# Altium PCB SYNCBOX.PcbDoc (part 3 of 6)
Units mil, origin at the board's own origin, x right, y up, seen from the top; angles counter-clockwise.
Board outline 8392.2 x 6163.59 mil, 6 copper layers (L1, L2, L3, L4 (PWR), L5, L6), stack 60.709 mil thick; 316 components, 422 nets, 1421 pads, 499 vias.
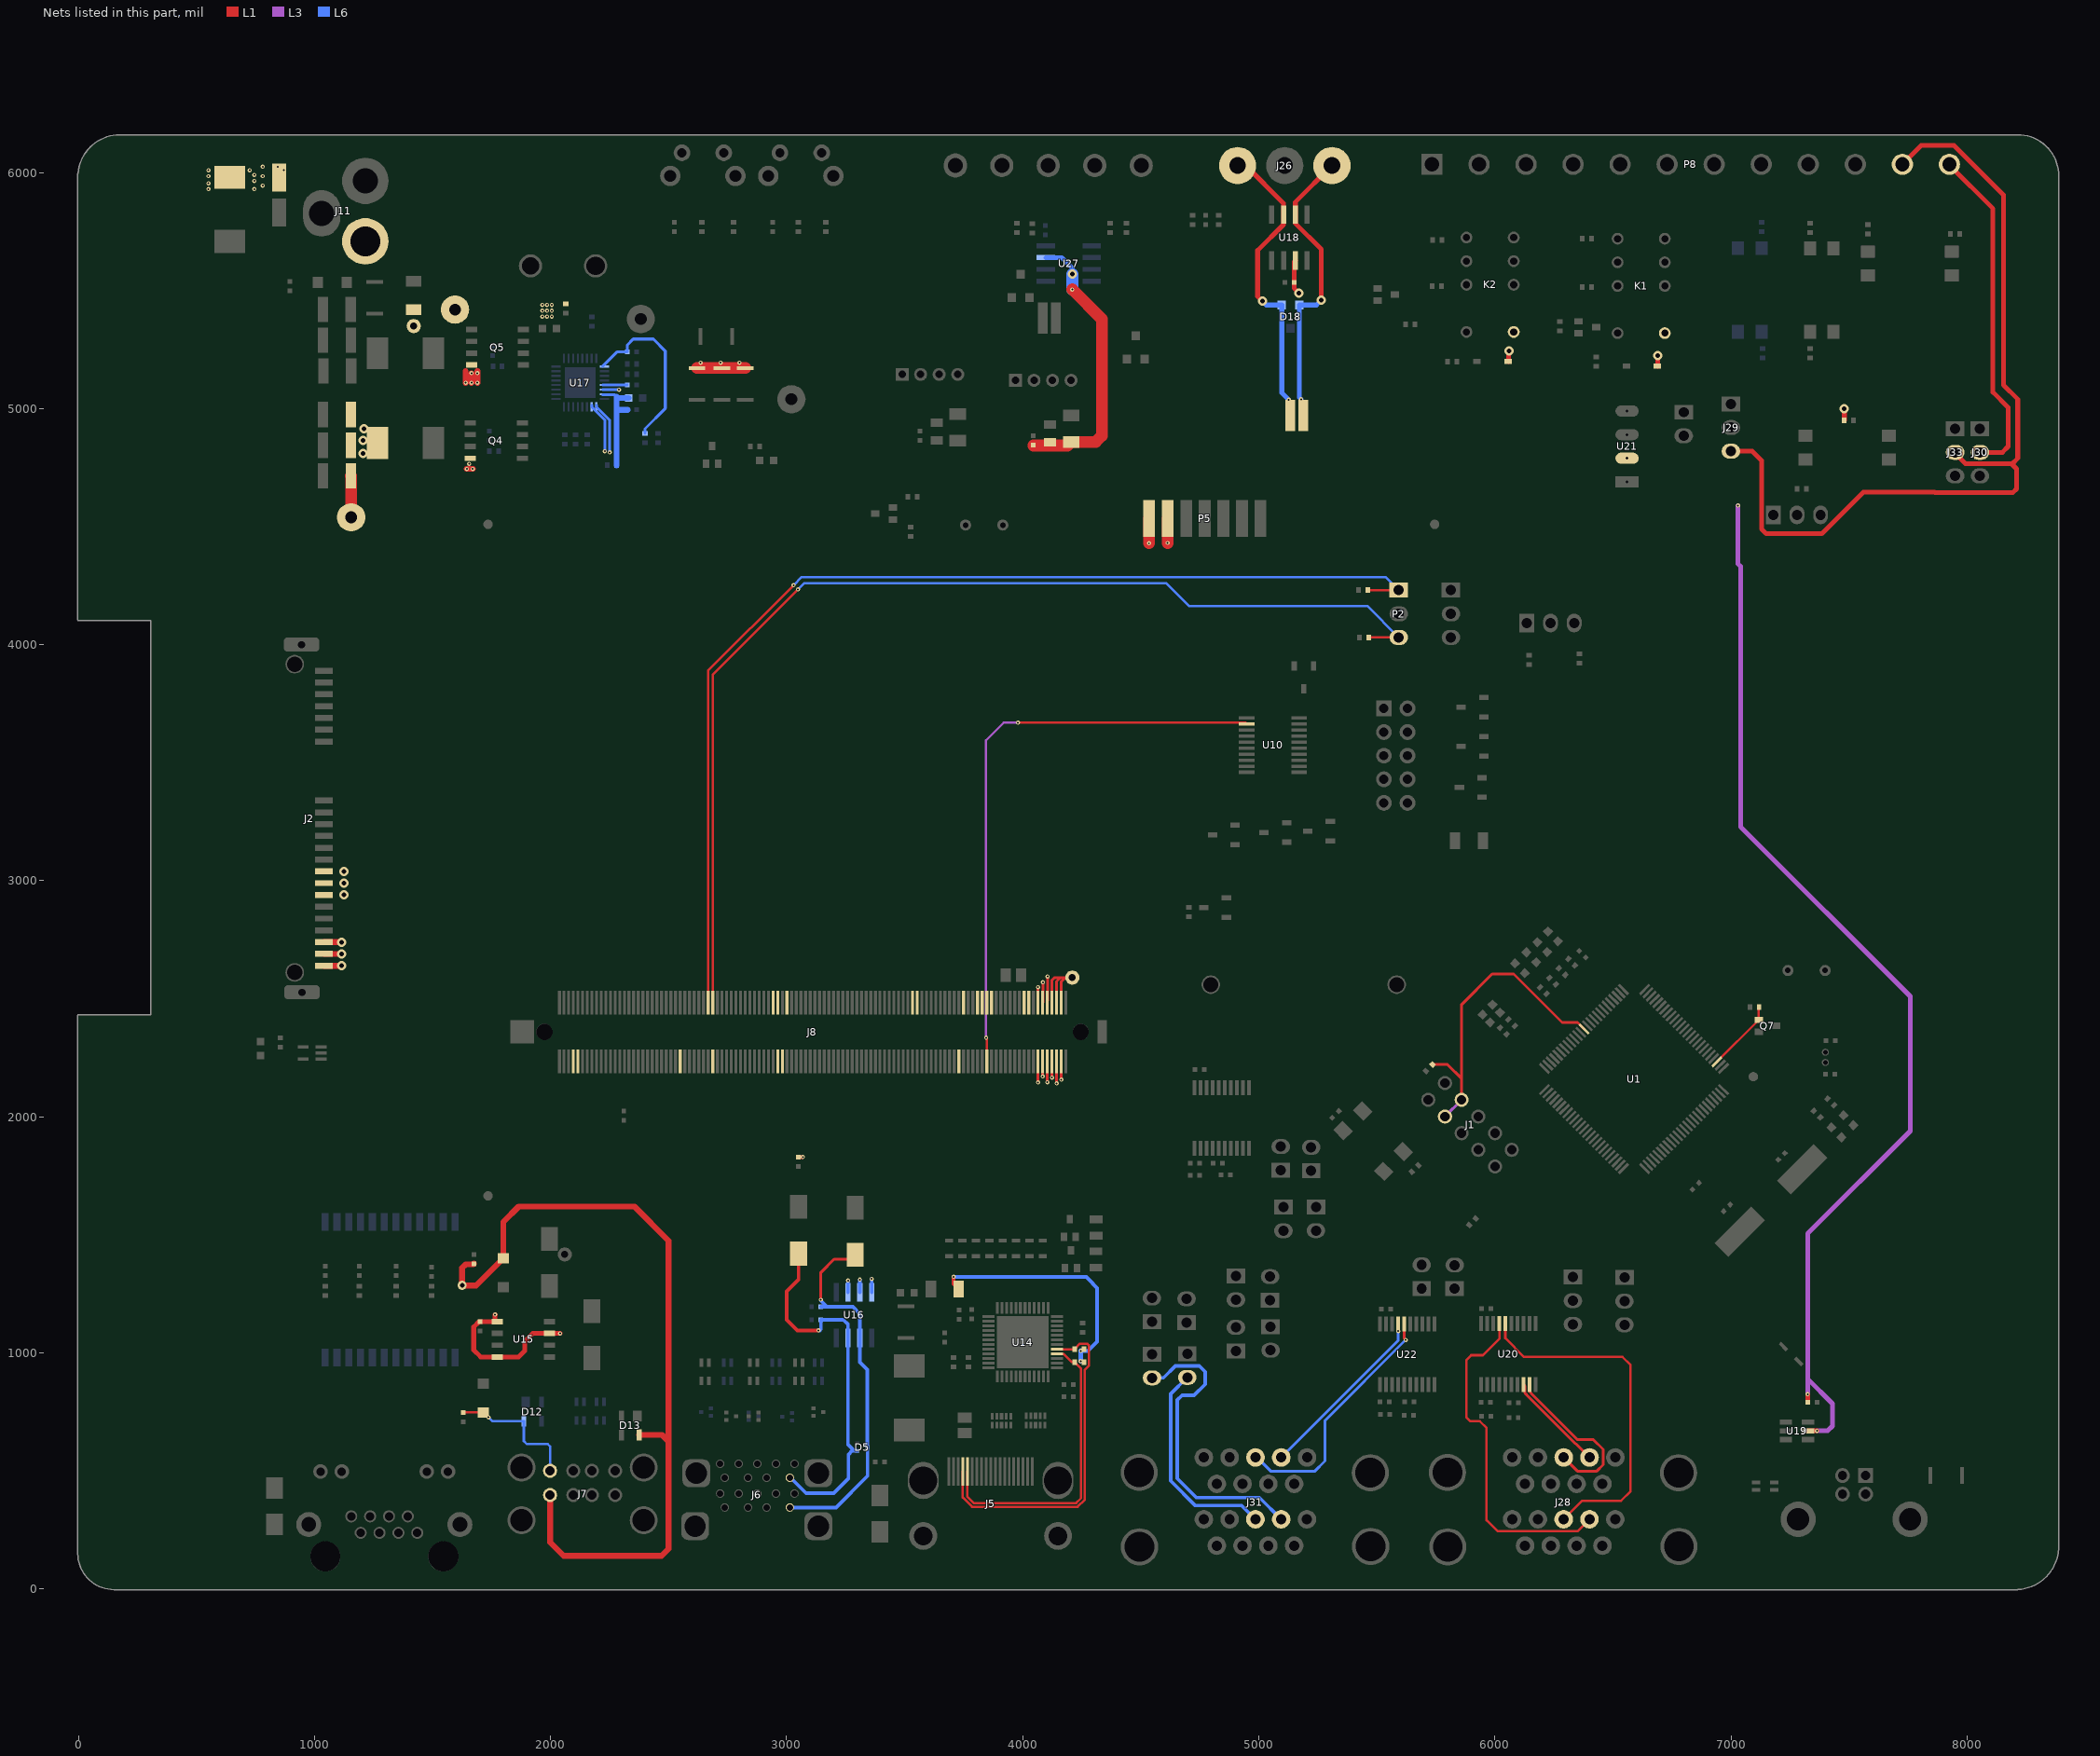
[diagram p6: the nets of this part, all layers, seen from the top]

## Part data (continued)
J9 J10: library part 0532530470, "CONN HEADER 4POS 2MM VERT TIN", Color=-, Manufacturer="Molex Inc", Supplier Part Number 1=WM19006-ND, .Creator=MM, Category="Connectors, Interconnects", ComponentLink1Description=http://www.molex.com/pdm_docs/sd/532530270_sd.pdf, ComponentLink1URL=http://www.molex.com/pdm_docs/sd/532530270_sd.pdf, Connector Type="Header, Shrouded", Contact Finish=Tin, Contact Finish Thickness=-, Contact Mating Length="0.130\" (3.30mm)", Contact Type="Male Pin", Fastening Type=-, Features=-, Manufacturer Part Number=0532530470, Mounting Type="Through Hole", Number of Positions=4, Number of Positions Loaded=All, Number of Rows=1, Packaging=Tray, Pitch="0.079\" (2.00mm)", Pricing 1="1=0.23, 10=0.211, 50=0.1576, 100=0.1464, 250=0.12948, 500=0.12386, 1000=0.10134, 2500=0.0929, 5000=0.09008 (USD)", RoHS="RoHS Compliant", Row Spacing=-, Stock 1=5160, Supplier 1=Digi-Key, Termination=Press-Fit
J11: "CONN PWR JACK 2.1X5.5MM HIGH CUR", Color=Black, Current Rating=5A, Manufacturer="CUI Inc", Operating Temperature="-25°C ~ 85°C", Supplier Part Number=CP-002AH-ND, Voltage - Rated=24VDC, Category="Connectors, Interconnects", ComponentLink1Description=http://products.cui.com/GetSpecForDigiKey.aspx?MFGNum=PJ-002AH, ComponentLink1URL=http://products.cui.com/GetSpecForDigiKey.aspx?MFGNum=PJ-002AH, Connector Type=Jack, Contact Material="Copper Alloy", Contact Material - Plating=Nickel, Family="Barrel - Power", Features=-, Gender=Male, Housing Color=Black, Housing Material=Thermoplastic, Internal Switch(s)="Single Switch, Normally Closed", Manufacturer Part Number=PJ-002AH, Mating connector="2.1mm ID, 5.5mm OD", Mounting Type="Through Hole, Right Angle", Number of Positions/Contacts="2 Conductors, 3 Contacts", Plug/Mating Plug Diameter="2.1mm ID, 5.5mm OD", Price 1k [$]=0.23625, Pricing 1="1=1.01, 10=0.704, 100=0.4724, 500=0.3819, 1000=0.3417, 2500=0.27135 (USD)", RoHS="RoHS Compliant", Shielding=Unshielded, Stock 1=138933, Supplier=Digikey, Supplier 1=Digi-Key, Supplier Part Number 1=CP-002AH-ND, Termination="Solder Eyelet(s)"
J12 J13 J14 J15 J16 J17 J18 J19 J20 J21 J22 J23 J24 J25 J32: library part 68001-202HLF, "BERGSTIK II .100\" SR STRAIGHT", Color=Black, Manufacturer=FCI, Supplier Part Number 1=609-3469-ND, Category="Connectors, Interconnects", ComponentLink1Description=http://portal.fciconnect.com/res/en/pdffiles/doc_search/68000.pdf, ComponentLink1URL=http://portal.fciconnect.com/res/en/pdffiles/doc_search/68000.pdf, Connector Type="Header, Unshrouded", Contact Finish=Gold, Contact Finish Thickness="15µin (0.38µm)", Contact Mating Length="0.230\" (5.84mm)", Contact Type="Male Pin", Fastening Type=-, Features=-, Manufacturer Part Number=68001-202HLF, Mounting Type="Through Hole", Number of Positions=2, Number of Positions Loaded=All, Number of Rows=1, Packaging=Bulk, Pitch="0.100\" (2.54mm)", Pricing 1="1=0.45, 10=0.265, 100=0.1172, 250=0.09828, 500=0.09072, 1000=0.07938, 5000=0.05065 (USD)", RoHS="RoHS Compliant", Row Spacing=-, Stock 1=13680, Supplier 1=Digi-Key, Termination=Solder
  J12 J13 J14 J15 J16 J17 J19 J20 J22 J23 J24 J25 J32: .Checked SCH=CHK
J26: library part 796644-3, "TERM BLOCK HDR 3POS 90DEG 5MM", Color=Green, Current - IEC=-, Manufacturer 1="TE Connectivity AMP Connectors", Material Flammability Rating="UL94 V-0", Operating Temperature="-40°C ~ 110°C", Supplier Part Number 1=A98249-ND, Built_By=EMA_UL_Team, C="Copyright (C) 2015 Accelerated Designs. All rights reserved", Category="Connectors, Interconnects", ComponentLink1Description=http://www.te.com/commerce/DocumentDelivery/DDEController?Action=srchrtrv&DocNm=796644&DocType=Customer+Drawing&DocLang=English, ComponentLink1URL=http://www.te.com/commerce/DocumentDelivery/DDEController?Action=srchrtrv&DocNm=796644&DocType=Customer+Drawing&DocLang=English, Contact Material="Copper Alloy", Contact Mating Finish=Tin, Contact Tail Length="0.138\" (3.50mm)", Description 1="TERM BLOCK HDR 3POS 90DEG 5MM", Features=-, Header Orientation="90°, Right Angle", Housing Material="Polyamide (PA66), Nylon 6/6", Ingress Protection=-, Insulation Height="0.329\" (8.36mm)", Manufacturer_Part_Number=796644-3, Manufacturer Part Number 1=796644-3, Mounting Type="Through Hole", Number of Levels=1, Number of Positions=3, Packaging=Bulk, Part Status=Active, Pitch="0.197\" (5.00mm)", Plug Wire Entry=-, Positions Per Level=3, Pricing 1="1=1.05, 10=0.734, 25=0.6848, 50=0.6218, 100=0.619, 250=0.52268, 500=0.49516, 1000=0.44014, 5000=0.35762 (USD)", RefDes=RefDes, RoHS="RoHS Compliant", Screw Size=-, Stock 1=93322, Supplier 1=Digi-Key, Termination Style=Solder, Torque - Screw=-, Type=DEV, Vendor="TE Connectivity", Wire Gauge or Range - AWG=-, Wire Gauge or Range - mm²=-, Wire Strip Length=-
J27: library part 292304-1, "1 Port Right Angle Through Hole Mount Female Type B USB Connector, 4 Position, -55 to 85 degC, RoHS, Tray", Supplier Part Number 1=A31725-ND, .Checked SCH=CHK, ComponentLink1Description="Manufacturer URL", ComponentLink1URL=http://www.te.com, ComponentLink2Description=Datasheet, ComponentLink2URL=https://datasheet.ciiva.com/851/eng-cd-292304-d2-851088.pdf, Connector Mounting="Through Hole", Contact Material="Copper Alloy", Contact Plating=Gold, Gender=Receptacle, Mounting Technology="Through Hole", No. of Positions=4, Orientation="Right Angle", PackageDescription="THD, 4-Leads, Body 15.71x12.04mm, Pitch 2.5mm", PackageReference=THD, Series=B, Supplier 1=Digi-Key, SVHC="To Be Advised", USB Connector Type="USB Type B", USB Standard="USB 2.0"
J28 J31: library part "DSUB-9 Stack", "189-009-613R491", Color=Black, Current Rating=5A, Manufacturer 1="NorComp Inc.", Material Flammability Rating="UL94 V-0", Operating Temperature="-55°C ~ 105°C", PackageDocument=O, Supplier Part Number 1=189-409MME-ND, Voltage Rating=-, .Checked SCH=CHK, Backset Spacing="0.318\" (8.08mm)", Category="Connectors, Interconnects", ComponentLink1Description=https://www.norcomp.net/rohspdfs/Connectors/18Y/189/613/189-YYY-613R491.pdf, ComponentLink1URL=https://www.norcomp.net/rohspdfs/Connectors/18Y/189/613/189-YYY-613R491.pdf, Connector Style="D-Sub - Stacked", Connector Type="Plug, Male Pins", Contact Finish=Gold, Contact Finish Thickness=Flash, Contact Form=Stamped, Contact Material=Brass, Contact Type=Signal, DatasheetDocument=1-Sep-1999, Description 1="CONN D-SUB PLUG 9POS R/A SLDR", Features="Board Lock, Grounding Indents, Shielded", Flange Feature="Housing/Shell (4-40)", Gender=Receptacle, Housing Material="Polyamide (PA9T), Nylon 9T", Ingress Protection=-, LatestRevisionDate=17-Jul-2002, LatestRevisionNote="Re-released for DXP Platform.", Manufacturer Part Number 1=189-009-613R491, Mounting Type="Panel Mount, Through Hole, Right Angle", Number of Positions="9, 9", Number of Rows="2, 2", Orientation="Right Angle", PackageReference=788750, Packaging=Tray, Part Status=Active, Positions=9, Pricing 1="1=6.96, 10=6.67, 25=6.09, 50=5.8, 100=5.51, 250=4.93, 500=4.64, 1000=4.06, 2500=3.857 (USD)", Published=15-Jun-2001, Publisher="Altium Limited", RoHS="RoHS Compliant", Shell Material, Finish="Steel, Nickel Plated", Shell Size, Connector Layout="1 (DE, E); 1 (DE, E)", Stock 1=1768, Supplier 1=Digi-Key, Termination=Solder, Wire Gauge=-
J29 J30 J33 J34: library part 68000-103HLF, "BERGSTIK II .100\" SR STRAIGHT", Color=Black, Manufacturer=FCI, Supplier Part Number 1=609-3461-ND, .Checked SCH=CHK, .Creator=MM, Category="Connectors, Interconnects", ComponentLink1Description=http://portal.fciconnect.com/Comergent//fci/drawing/68000.pdf, ComponentLink1URL=http://portal.fciconnect.com/Comergent//fci/drawing/68000.pdf, Connector Type="Header, Unshrouded", Contact Finish="Gold or Gold, GXT™", Contact Finish Thickness="30µin (0.76µm)", Contact Mating Length="0.230\" (5.84mm)", Contact Type="Male Pin", Fastening Type=-, Features=-, Manufacturer Part Number=68000-103HLF, Mounting Type="Through Hole", Number of Positions=3, Number of Positions Loaded=All, Number of Rows=1, Packaging=Bulk, Pitch="0.100\" (2.54mm)", Pricing 1="1=0.15, 10=0.145, 25=0.108, 50=0.0924 (USD)", RoHS="RoHS Compliant", Row Spacing=-, Stock 1=37214, Supplier 1=Digi-Key, Termination=Solder
K1 K2: "RELAY GEN PURPOSE DPDT 2A 5V", Coil Power="140 mW", Coil Voltage=5VDC, Manufacturer 1=KEMET, Operating Temperature="-40°C ~ 85°C", Supplier Part Number 1=399-11052-5-ND, Switching Voltage="250VAC, 220VDC - Max", Turn Off Voltage (Min)="0.5 VDC", Turn On Voltage (Max)="3.75 VDC", Built_By=EMA_UL_Team, C="Copyright (C) 2015 Accelerated Designs. All rights reserved", Category=Relays, Coil Type="Non Latching", ComponentLink1Description=https://api.kemet.com/component-edge/download/datasheet/EC2-5NU.pdf, ComponentLink1URL=https://api.kemet.com/component-edge/download/datasheet/EC2-5NU.pdf, Contact Form="DPDT (2 Form C)", Contact Material="Silver Alloy, Gold Alloy", Description 1="RELAY GEN PURPOSE DPDT 2A 5V", Features=-, Manufacturer_Part_Number=EC2-5NU, Manufacturer Part Number 1=EC2-5NU, Mounting Type="Through Hole", Packaging=Tube, Part Status=Active, Pricing 1="1=1.63, 10=1.53, 25=1.36, 50=1.292, 100=1.224, 250=1.088, 500=1.02, 1000=0.952, 5000=0.918 (USD)", RefDes=RefDes, Relay Type="General Purpose", RoHS="RoHS Compliant", Stock 1=14823, Supplier 1=Digi-Key, Termination Style="PC Pin", Type=DEV, Vendor=KEMET
  K1: .Checked SCH=CHK
L1 L2 L3 L4 L5 L6 L7 L8 L11: "CHOKE COMM MODE 90 OHM .4A SMD", Current=400mA, DC Resistance (DCR)="190 mOhm Max", Inductance=-, Manufacturer="TDK Corporation", Operating Temperature="-25°C ~ 85°C", Package / Case="0805 (2012 Metric), 4 Lead", Power (Watts)="0.063W, 1/16W", Resistance (Ohms)=8.2K, Supplier Part Number 1=445-2207-1-ND, Temperature Coefficient=±100ppm/°C, Tolerance=±1%, Category=Filters, ComponentLink1Description=http://www.tdk.co.jp/tefe02/e9719_acm2012.pdf, ComponentLink1URL=http://www.tdk.co.jp/tefe02/e9719_acm2012.pdf, ComponentLink2Description=http://www.yageo.com/documents/recent/PYu-RC0402_51_RoHS_L_6.pdf, ComponentLink2URL=http://www.yageo.com/documents/recent/PYu-RC0402_51_RoHS_L_6.pdf, Composition="Thick Film", Features=-, Filter Type="Data, Signal Line", Height="0.016\" (0.40mm)", Height (Max)="0.051\" (1.30mm)", Impedance="90 Ohm", Manufacturer Part Number=ACM2012-900-2P-T002, Mounting Type="Surface Mount", Number of Lines=2, Number of Terminations=2, Packaging="Cut Tape (CT)", Pricing 1="1=0.48, 10=0.448, 50=0.42, 100=0.364, 500=0.308, 1000=0.252 (USD)", RoHS="RoHS Compliant", Size / Dimension="0.079\" L x 0.047\" W (2.00mm x 1.20mm)", Stock 1=175768, Supplier 1=Digi-Key
  L1 L2 L3 L4 L5 L6 L7 L8: .Checked PCB=USED, .Checked SCH=USED
  L11: .Checked PCB=CHK, .Checked SCH=CHK
L9 L10: library part IHLP2525CZER4R7M01, "INDUCTOR POWER 4.7UH 5.5A SMD", Current=5.5A, Current - Saturation=10A, DC Resistance (DCR)="40 mOhm Max", Frequency - Self Resonant=-, Frequency - Test=100kHz, Manufacturer=Vishay/Dale, Operating Temperature="-55°C ~ 125°C", Package / Case="0.270\" L x 0.255\" W x 0.118\" H (6.86mm x 6.47mm x 3.00mm)", Supplier Part Number=541-1010-1-ND, Tolerance=±20%, Applications="General Purpose", Category="Inductors, Coils, Chokes", ComponentLink1Description=http://www.vishay.com/doc?34104, ComponentLink1URL=http://www.vishay.com/doc?34104, Current - Temperature Rise=5.5A, Inductance=4.7µH, Manufacturer Part Number=IHLP2525CZER4R7M01, Material - Core=-, Mounting Type="Surface Mount", Packaging="Cut Tape (CT)", Price 1k [$]=1.09800, Pricing 1="1=2.26, 10=1.83, 100=1.525, 500=1.22, 1000=1.098 (USD)", Q @ Freq=-, RoHS="RoHS Compliant", Shielding=Shielded, Stock 1=25684, Supplier=Digikey, Supplier 1=Digi-Key, Supplier Part Number 1=541-1010-1-ND, Type=-
LS1 LS2: "AUDIO MAGNETIC XDCR 2-4V TH", Current - Supply=80mA, Frequency=2.73kHz, Manufacturer 1="Soberton Inc.", Operating Mode="Single Tone", Operating Temperature="-20°C ~ 60°C", Ratings=-, Supplier Part Number 1=433-1032-ND, Voltage Range="2 ~ 4V", Approvals=-, Category="Audio Products", ComponentLink1Description=http://cirlw3yrzg4afc1x47lv2k18.wpengine.netdna-cdn.com/wp-content/uploads/2016/10/GT-0903A-Rev.A_2016-1.pdf, ComponentLink1URL=http://cirlw3yrzg4afc1x47lv2k18.wpengine.netdna-cdn.com/wp-content/uploads/2016/10/GT-0903A-Rev.A_2016-1.pdf, Description 1="AUDIO MAGNETIC XDCR 2-4V TH", Driver Circuitry="Transducer, Externally Driven", Duration=-, Height - Seated (Max)="0.197\" (5.00mm)", Input Type="Zero-Peak Signal", Manufacturer Part Number 1=GT-0903A, Mounting Type="Through Hole", Packaging=Tray, Part Status=Active, Port Location=Top, Pricing 1="1=0.97, 10=0.774, 25=0.7036, 50=0.658, 100=0.6125, 250=0.56, 500=0.5215, 1000=0.4865, 5000=0.4375 (USD)", RoHS="RoHS Compliant", Size / Dimension="0.354\" Dia (9.00mm)", Sound Pressure Level (SPL)="85dB @ 3V, 10cm", Stock 1=13944, Supplier 1=Digi-Key, Technology=Magnetic, Termination="PC Pins"
  LS1: .Checked SCH=USED
  LS2: .Checked PCB=CHK, .Checked SCH=CHK
MH1 MH2 MH3 MH4: "Mounting Hole 12mm Diameter, 10mm Drill"
MH5 MH6 MH7 MH8: "Mounting Hole 7mm Diameter, 3.2mm Drill"
P2 P3 P4 P6 P7: "CONN HEADER 3POS .100\" STR GOLD", Color=Black, Manufacturer=FCI, Supplier Part Number 1=609-1305-ND, .Creator=MM, Category="Connectors, Interconnects", ComponentLink1Description=http://portal.fciconnect.com/Comergent//fci/drawing/76384.pdf, ComponentLink1URL=http://portal.fciconnect.com/Comergent//fci/drawing/76384.pdf, Connector Type="Header, Shrouded", Contact Finish="Gold, GXT™", Contact Finish Thickness="30µin (0.76µm)", Contact Mating Length="0.197\" (5.00mm)", Contact Type="Male Pin", Fastening Type="Friction Lock", Features=-, Manufacturer Part Number=76384-303LF, Mounting Type="Through Hole", Number of Positions=3, Number of Positions Loaded=All, Number of Rows=1, Packaging=Tube, Pitch="0.100\" (2.54mm)", Pricing 1="1=0.59, 10=0.556, 25=0.5, 50=0.4444, 100=0.426, 250=0.38892, 500=0.3704, 1000=0.30558, 2500=0.2778 (USD)", RoHS="RoHS Compliant", Row Spacing=-, Stock 1=1441, Supplier 1=Digi-Key, Termination=Solder
  P2: .Checked PCB=CHK, .Checked SCH=CHK
  P4 P7: .Checked SCH=CHK
P5: "HEADER 2MM WTB R/A SQ PIN 7CKT", Current Rating=2A, Insulation Color=Natural, Manufacturer 1="JST Sales America Inc.", Manufacturer Part Number 1=S7B-PH-SM4-TB(LF)(SN), Material Flammability Rating="UL94 V-0", Operating Temperature="-25°C ~ 85°C", Supplier Part Number 1=455-1754-6-ND, Voltage Rating=100V, Applications=-, Category="Connectors, Interconnects", ComponentLink1Description=http://www.jst-mfg.com/product/pdf/eng/ePH.pdf, ComponentLink1URL=http://www.jst-mfg.com/product/pdf/eng/ePH.pdf, Connector Type=Header, Contact Finish - Mating=Tin, Contact Finish - Post=Tin, Contact Finish Thickness - Mating=-, Contact Finish Thickness - Post=-, Contact Length - Mating="0.130\" (3.30mm)", Contact Length - Post=-, Contact Material="Copper Alloy", Contact Shape=Square, Contact Type="Male Pin", Description 1="CONN HEADER PH SIDE 7POS 2MM SMD", Fastening Type="Detent Lock", Features="Solder Retention", Ingress Protection=-, Insulation Height="0.217\" (5.51mm)", Insulation Material="Polyamide (PA6T), Nylon 6T", Mated Stacking Heights=-, Mounting Type="Surface Mount, Right Angle", Number of Positions=7, Number of Positions Loaded=All, Number of Rows=1, Overall Contact Length=-, Packaging=Digi-Reel®, Part Status=Active, Pitch - Mating="0.079\" (2.00mm)", Pricing 1="1=0.91, 10=0.798, 100=0.6882, 500=0.56304 (USD)", RoHS="RoHS Compliant", Row Spacing - Mating=-, Shrouding="Shrouded - 4 Wall", Stock 1=83702, Style="Board to Cable/Wire", Supplier 1=Digi-Key, Termination=Solder
P8: "TERM BLOCK HDR 12POS 5.08MM", Color=Black, Current - IEC=-, Manufacturer 1="Molex, LLC", Material Flammability Rating="UL94 V-0", Operating Temperature="-40°C ~ 105°C", Supplier Part Number 1=WM7852-ND, .Checked SCH=CHK, Category="Connectors, Interconnects", ComponentLink1Description=https://www.molex.com/pdm_docs/sd/395321002_sd.pdf, ComponentLink1URL=https://www.molex.com/pdm_docs/sd/395321002_sd.pdf, Contact Material=Brass, Contact Mating Finish=Tin, Contact Tail Length="0.150\" (3.81mm)", Description 1="TERM BLOCK HDR 12POS 5.08MM", Features=-, Header Orientation="90°, Right Angle", Housing Material="Polyamide (PA66), Nylon 6/6", Ingress Protection=-, Insulation Height="0.472\" (12.00mm)", Manufacturer Part Number 1=0395321012, Mounting Type="Through Hole", Number of Levels=1, Number of Positions=12, Packaging=Bulk, Part Status=Active, Pitch="0.200\" (5.08mm)", Plug Wire Entry=-, Positions Per Level=12, Pricing 1="1=3.15, 10=3.02, 100=2.5164, 500=2.1389, 1000=1.82436, 5000=1.63563 (USD)", RoHS="RoHS Compliant", Screw Size=-, Stock 1=207, Supplier 1=Digi-Key, Termination Style=Solder, Torque - Screw=-, Type="Header, Male Pins, Shrouded (4 Side)", Wire Gauge or Range - AWG=-, Wire Gauge or Range - mm²=-, Wire Strip Length=-
P9: library part 691313710005, "TERM BLOCK HDR 5POS 90DEG 5MM", Color=Green, Current - IEC=-, Manufacturer 1="Wurth Electronics Inc.", Material Flammability Rating="UL94 V-0", Operating Temperature="-40°C ~ 105°C", Supplier Part Number 1=732-2802-ND, .Checked SCH=CHK, Category="Connectors, Interconnects", ComponentLink1Description=http://katalog.we-online.de/em/datasheet/6913137100xx.pdf, ComponentLink1URL=http://katalog.we-online.de/em/datasheet/6913137100xx.pdf, Contact Material=Brass, Contact Mating Finish=Tin, Contact Tail Length="0.157\" (4.00mm)", Description 1="TERM BLOCK HDR 5POS 90DEG 5MM", Features=-, Header Orientation="90°, Right Angle", Housing Material="Polybutylene Terephthalate (PBT)", Ingress Protection=-, Insulation Height="0.335\" (8.51mm)", Manufacturer Part Number 1=691313710005, Mounting Type="Through Hole", Number of Levels=1, Number of Positions=5, Packaging=Bulk, Part Status=Active, Pitch="0.197\" (5.00mm)", Plug Wire Entry=-, Positions Per Level=5, Pricing 1="1=1.25, 10=1.1, 50=0.95, 100=0.85, 330=0.8, 660=0.75 (USD)", RoHS="RoHS Compliant", Screw Size=-, Stock 1=141, Supplier 1=Digi-Key, Termination Style=Solder, Torque - Screw=-, Type="Header, Male Pins, Shrouded (4 Side)", Wire Gauge or Range - AWG=-, Wire Gauge or Range - mm²=-, Wire Strip Length=-
Q1 Q7: library part DMG1012UW-7, Current - Continuous Drain (Id) @ 25°C="1A (Ta)", Drive Voltage (Max Rds On,  Min Rds On)="1.8V, 4.5V", Manufacturer 1="Diodes Incorporated", Operating Temperature="-55°C ~ 150°C (TJ)", Package / Case="SC-70, SOT-323", Power Dissipation (Max)="290mW (Ta)", Supplier Device Package=SOT-323, Supplier Part Number 1=DMG1012UW-7DICT-ND, Category="Discrete Semiconductor Products", Code_JEDEC=TO-220-AB, ComponentLink1Description="Manufacturer Link", ComponentLink1URL=http://www.irf.com/, ComponentLink2Description=https://www.diodes.com/assets/Datasheets/ds31859.pdf, ComponentLink2URL=https://www.diodes.com/assets/Datasheets/ds31859.pdf, DatasheetVersion=PD-9.814, Description 1="MOSFET N-CH 20V 1A SOT323", Digikey P/N=DMG1012UW-7DITR-ND, FET Feature=-, FET Type=N-Channel, LatestRevisionDate=17-Jul-2002, LatestRevisionNote="Re-released for DXP Platform.", Manufacturer Part Number 1=DMG1012UW-7, Mounting Type="Surface Mount", Note="Pin 2 is electrically connected to pin 4.", PackageReference=TO-220AB, Packaging="Cut Tape (CT)", Part Status=Active, Pricing 1="1=0.41, 10=0.37, 100=0.2074, 500=0.1111, 1000=0.07554 (USD)", Published=8-Jun-2000, Publisher="Altium Limited", Rds On (Max) @ Id, Vgs="450 mOhm @ 600mA, 4.5V", RoHS="RoHS Compliant", Stock 1=211076, Supplier 1=Digi-Key, Technology="MOSFET (Metal Oxide)", Vgs (Max)=±6V, Vgs(th) (Max) @ Id="1V @ 250µA"
  Q1: .Checked SCH=USED
  Q7: .Checked SCH=CHK
Q2 Q3 Q6: "MOSFET N-CH 60V 310MA SOT323", Current - Continuous Drain (Id) @ 25° C=310mA, Drain to Source Voltage (Vdss)=60V, Input Capacitance (Ciss) @ Vds="50pF @ 10V", Manufacturer="NXP Semiconductors", Package / Case="SC-70, SOT-323", Power - Max=275mW, Supplier Device Package=SC-70, Supplier Part Number 1=568-5980-1-ND, Category="Discrete Semiconductor Products", ComponentLink1Description=http://www.nxp.com/documents/data_sheet/2N7002BKW.pdf, ComponentLink1URL=http://www.nxp.com/documents/data_sheet/2N7002BKW.pdf, FET Feature="Logic Level Gate", FET Type="MOSFET N-Channel, Metal Oxide", Gate Charge (Qg) @ Vgs="0.6nC @ 4.5V", Manufacturer Part Number=2N7002BKW,115, Mounting Type="Surface Mount", Packaging="Cut Tape (CT)", Pricing 1="1=0.39, 10=0.354, 25=0.2548, 100=0.1983, 250=0.12456, 500=0.10616, 1000=0.07233 (USD)", Rds On (Max) @ Id, Vgs="1.6 Ohm @ 500mA, 10V", RoHS="RoHS Compliant", Stock 1=15666, Supplier 1=Digi-Key, Vgs(th) (Max) @ Id="2.1V @ 250µA"
  Q2 Q3: .Checked SCH=CHK
Q4 Q5: "MOSFET DL N-CH 30V 6.8A 8-SOIC", Current - Continuous Drain (Id) @ 25° C="5.8A, 8.2A", Drain to Source Voltage (Vdss)=30V, Input Capacitance (Ciss) @ Vds=-, Manufacturer=Vishay/Siliconix, Package / Case="8-SOIC (0.154\", 3.90mm Width)", Power - Max="1W, 1.25W", Supplier Device Package=8-SOICN, Supplier Part Number=SI4816BDY-T1-GE3CT-ND, Category="Discrete Semiconductor Products", ComponentLink1Description=http://www.vishay.com/docs/73026/si4816bd.pdf, ComponentLink1URL=http://www.vishay.com/docs/73026/si4816bd.pdf, Family="FETs - Arrays", FET Feature="Logic Level Gate", FET Type="2 N-Channel (Dual)", Gate Charge (Qg) @ Vgs="10nC @ 5V", Manufacturer Part Number=SI4816BDY-T1-GE3, Mounting Type="Surface Mount", Packaging="Cut Tape (CT)", Price 1k [$]=0.84800, Pricing 1="1=1.84, 25=1.4228, 100=1.2912, 250=1.1594, 500=1.0013, 1000=0.8432 (USD)", Rds On (Max) @ Id, Vgs="18.5 mOhm @ 6.8A, 10V", RoHS="RoHS Compliant", Stock 1=15735, Supplier=Digikey, Supplier 1=Digi-Key, Supplier Part Number 1=SI4816BDY-T1-GE3CT-ND, Vgs(th) (Max) @ Id="3V @ 250µA"
Q8 Q9: "TRANS NPN 40V 0.6A SC70-3", Base Part Number=MMBT2222A, Current - Collector Cutoff (Max)=-, DC Current Gain (hFE) (Min) @ Ic, Vce="100 @ 150mA, 10V", Frequency - Transition=300MHz, Manufacturer 1="ON Semiconductor", Operating Temperature="-55°C ~ 150°C (TJ)", Package / Case="SC-70, SOT-323", Supplier Device Package="SC-70-3 (SOT323)", Supplier Part Number 1=MMBT2222AWT3GOSDKR-ND, .Checked SCH=CHK, Category="Discrete Semiconductor Products", ComponentLink1Description=http://www.onsemi.com/pub/Collateral/MMBT2222AWT1-D.PDF, ComponentLink1URL=http://www.onsemi.com/pub/Collateral/MMBT2222AWT1-D.PDF, Description 1="TRANS NPN 40V 0.6A SC70-3", Manufacturer Part Number 1=MMBT2222AWT3G, Mounting Type="Surface Mount", Packaging=Digi-Reel®, Part Status=Active, Pricing 1="1=0.14, 10=0.126, 100=0.0688, 500=0.04236, 1000=0.02889 (USD)", RoHS="RoHS Compliant", Stock 1=9990, Supplier 1=Digi-Key, Transistor Type=NPN, Vce Saturation (Max) @ Ib, Ic="1V @ 50mA, 500mA"
  Q8: .Checked PCB=CHK
R1 R2 R10 R40 R65 R66 R67 R68 R69 R70: library part RMCF0402FT240R, "RES TF 240 OHM 1% 0.0625W 0402", Manufacturer="Stackpole Electronics Inc", Package / Case="0402 (1005 Metric)", Power (Watts)="0.063W, 1/16W", Resistance (Ohms)=240, Supplier Part Number=RMCF0402FT240RCT-ND, Temperature Coefficient=±100ppm/°C, Tolerance=±1%, Category=Resistors, ComponentLink1Description=http://www.seielect.com/Catalog/SEI-RMCF.pdf, ComponentLink1URL=http://www.seielect.com/Catalog/SEI-RMCF.pdf, Composition="Thick Film", Features=-, Height="0.016\" (0.40mm)", Manufacturer Part Number=RMCF0402FT240R, Number of Terminations=2, Packaging="Cut Tape (CT)", Price 1k [$]=0.00384, Pricing 1="1=0.04, 10=0.025, 50=0.0138, 100=0.0105, 250=0.0078, 500=0.00576, 1000=0.00384 (USD)", RoHS="RoHS Compliant", Size / Dimension="0.039\" L x 0.020\" W (1.00mm x 0.50mm)", Stock 1=39860, Supplier=Digikey, Supplier 1=Digi-Key, Supplier Part Number 1=RMCF0402FT240RCT-ND
  R10: .Checked PCB=USED, .Checked SCH=USED
  R65 R66 R67 R68 R69 R70: .Checked SCH=CHK
R3 R18 R25 R28 R29 R33 R34 R35 R37 R42 R49 R50 R51 R53: library part RC1005J000CS, "RES SMD 0 OHM JUMPER 1/16W 0402", Manufacturer 1="Samsung Electro-Mechanics", Operating Temperature="-55°C ~ 155°C", Package / Case="0402 (1005 Metric)", Power (Watts)="0.063W, 1/16W", Supplier Device Package=0402, Supplier Part Number 1=1276-3480-6-ND, Temperature Coefficient=-, Tolerance=Jumper, Category=Resistors, ComponentLink1Description=http://www.samsungsem.com/kr/support/product-search/chip-resistor/RC1005J000CS.jsp, ComponentLink1URL=http://www.samsungsem.com/kr/support/product-search/chip-resistor/RC1005J000CS.jsp, Composition="Thick Film", Description 1="RES SMD 0 OHM JUMPER 1/16W 0402", Failure Rate=-, Features="Moisture Resistant", Height - Seated (Max)="0.016\" (0.40mm)", Manufacturer Part Number 1=RC1005J000CS, Packaging=Digi-Reel®, Part Status=Active, Pricing 1="1=0.1, 10=0.016, 25=0.0116, 50=0.009, 100=0.0066, 250=0.005, 500=0.004, 1000=0.00295, 5000=0.00211 (USD)", RoHS="RoHS Compliant", Size / Dimension="0.039\" L x 0.020\" W (1.00mm x 0.50mm)", Stock 1=9624698, Supplier 1=Digi-Key
  R18 R42 R49 R50 R51 R53: .Checked SCH=CHK
R4 R5 R47: library part RC0402FR-0747K5L, "RES 47.5K OHM 1/16W 1% 0402 SMD", Manufacturer=Yageo, Package / Case="0402 (1005 Metric)", Power (Watts)="0.063W, 1/16W", Resistance (Ohms)=47.5K, Supplier Part Number 1=311-47.5KLRCT-ND, Temperature Coefficient=±100ppm/°C, Tolerance=±1%, Category=Resistors, ComponentLink1Description=http://www.yageo.com/documents/recent/PYu-RC0402_51_RoHS_L_6.pdf, ComponentLink1URL=http://www.yageo.com/documents/recent/PYu-RC0402_51_RoHS_L_6.pdf, Composition="Thick Film", Features=-, Height="0.016\" (0.40mm)", Manufacturer Part Number=RC0402FR-0747K5L, Number of Terminations=2, Packaging="Cut Tape (CT)", Pricing 1="10=0.014, 100=0.0063, 500=0.00382, 1000=0.0027, 5000=0.00203 (USD)", RoHS="RoHS Compliant", Size / Dimension="0.039\" L x 0.020\" W (1.00mm x 0.50mm)", Stock 1=59607, Supplier 1=Digi-Key
  R47: .Checked SCH=CHK
R6 R7 R8 R9: library part RC1005F750CS, "RES SMD 75 OHM 1% 1/16W 0402", Manufacturer 1="Samsung Electro-Mechanics", Operating Temperature="-55°C ~ 155°C", Package / Case="0402 (1005 Metric)", Power (Watts)="0.063W, 1/16W", Supplier Device Package=0402, Supplier Part Number 1=1276-3476-6-ND, Temperature Coefficient=±100ppm/°C, Tolerance=±1%, .Checked PCB=USED, .Checked SCH=USED, Category=Resistors, ComponentLink1Description=http://www.samsungsem.com/kr/support/product-search/chip-resistor/RC1005F750CS.jsp, ComponentLink1URL=http://www.samsungsem.com/kr/support/product-search/chip-resistor/RC1005F750CS.jsp, Composition="Thick Film", Description 1="RES SMD 75 OHM 1% 1/16W 0402", Failure Rate=-, Features="Moisture Resistant", Height - Seated (Max)="0.016\" (0.40mm)", Manufacturer Part Number 1=RC1005F750CS, Packaging=Digi-Reel®, Part Status=Active, Pricing 1="1=0.1, 10=0.021, 100=0.0087, 1000=0.00391, 2500=0.00339, 5000=0.0028 (USD)", RoHS="RoHS Compliant", Size / Dimension="0.039\" L x 0.020\" W (1.00mm x 0.50mm)", Stock 1=924150, Supplier 1=Digi-Key
R11 R36 R39: library part ERJ-2RKF33R0X, "RES SMD 33 OHM 1% 1/10W 0402", Manufacturer 1="Panasonic Electronic Components", Operating Temperature="-55°C ~ 155°C", Package / Case="0402 (1005 Metric)", Power (Watts)="0.1W, 1/10W", Supplier Device Package=0402, Supplier Part Number 1=P33.0LDKR-ND, Temperature Coefficient=±100ppm/°C, Tolerance=±1%, Category=Resistors, ComponentLink1Description=https://industrial.panasonic.com/cdbs/www-data/pdf/RDA0000/AOA0000C304.pdf, ComponentLink1URL=https://industrial.panasonic.com/cdbs/www-data/pdf/RDA0000/AOA0000C304.pdf, Composition="Thick Film", Description 1="RES SMD 33 OHM 1% 1/10W 0402", Failure Rate=-, Features="Automotive AEC-Q200", Height - Seated (Max)="0.016\" (0.40mm)", Manufacturer Part Number 1=ERJ-2RKF33R0X, Packaging=Digi-Reel®, Part Status=Active, Pricing 1="1=0.1, 10=0.056, 100=0.0227, 1000=0.01021, 2500=0.00886, 5000=0.00732 (USD)", RoHS="RoHS Compliant", Size / Dimension="0.039\" L x 0.020\" W (1.00mm x 0.50mm)", Stock 1=459707, Supplier 1=Digi-Key
  R11: .Checked SCH=CHK
R12: library part RC0402JR-07100RL, "RES SMD 100 OHM 5% 1/16W 0402", Case Code - in=0402, Case Code - mm=1005, Manufacturer 1=Yageo, Operating Temperature Range="- 55 C to + 155 C", Package / Case="0402 (1005 metric)", Power Rating="62.5 mW (1/16 W)", Resistance="100 Ohms", Supplier Part Number 1=RC0402JR-07100RL-CUTT, Temperature Coefficient="100 PPM / C", Tolerance="5 %", Voltage Rating="50 V", .Checked PCB=used, .Checked SCH=used, Brand=Yageo, ComponentLink1Description=http://www.farnell.com/datasheets/2167052.pdf?src-supplier=Element14, ComponentLink1URL=http://www.farnell.com/datasheets/2167052.pdf?src-supplier=Element14, ComponentLink2Description=http://www.yageo.com/documents/recent/PYu-RC_Group_51_RoHS_L_10.pdf?src-supplier=Digi-Key, ComponentLink2URL=http://www.yageo.com/documents/recent/PYu-RC_Group_51_RoHS_L_10.pdf?src-supplier=Digi-Key, ComponentLink3Description=http://www.yageo.com/documents/recent/PYu-RC_Group_51_RoHS_L_9.pdf?src-supplier=Digi-Key, ComponentLink3URL=http://www.yageo.com/documents/recent/PYu-RC_Group_51_RoHS_L_9.pdf?src-supplier=Digi-Key, ComponentLink4Description=http://www.yageo.com/documents/recent/PYu-RC0402_51_RoHS_L_6_r.pdf?src-supplier=Future+Electronics, ComponentLink4URL=http://www.yageo.com/documents/recent/PYu-RC0402_51_RoHS_L_6_r.pdf?src-supplier=Future+Electronics, ComponentLink5Description=http://www.mouser.com/ds/2/447/PYu-RC0402_51_RoHS_L_6_r-8721.pdf?src-supplier=Mouser, ComponentLink5URL=http://www.mouser.com/ds/2/447/PYu-RC0402_51_RoHS_L_6_r-8721.pdf?src-supplier=Mouser, ComponentLink6Description=http://www.farnell.com/datasheets/1018594.pdf?src-supplier=Element14, ComponentLink6URL=http://www.farnell.com/datasheets/1018594.pdf?src-supplier=Element14, Description 1="RES SMD 100 OHM 5% 1/16W 0402", Height="0.35 mm", Length="1 mm", Manufacturer Part Number 1=RC0402JR-07100RL, Packaging=Reel, Pricing 1="1=0.098, 500=0.004, 1500=0.0023, 2500=0.0017, 5000=0.0012 (USD)", Product="Thick Film Resistors General Purpose", Product Category="Thick Film Resistors", RoHS=True, Series=RC, Stock 1=1979840, Supplier 1="Future Electronics", Termination Style=SMD/SMT, Type="General Purpose Chip Resistor Surface Mount", Unit Weight="0.000023 oz", Width="0.5 mm"
R13 R14 R41 R45 R46 R56 R57 R58 R59 R61 R62 R71 R72 R73 R75: library part ERJ-2RKF1001X, "RES SMD 1K OHM 1% 1/10W 0402", Manufacturer 1="Panasonic Electronic Components", Operating Temperature="-55°C ~ 155°C", Package / Case="0402 (1005 Metric)", Power (Watts)="0.1W, 1/10W", Supplier Device Package=0402, Supplier Part Number 1=P1.00KLDKR-ND, Temperature Coefficient=±100ppm/°C, Tolerance=±1%, Category=Resistors, ComponentLink1Description=https://industrial.panasonic.com/cdbs/www-data/pdf/RDA0000/AOA0000C304.pdf, ComponentLink1URL=https://industrial.panasonic.com/cdbs/www-data/pdf/RDA0000/AOA0000C304.pdf, Composition="Thick Film", Description 1="RES SMD 1K OHM 1% 1/10W 0402", Failure Rate=-, Features="Automotive AEC-Q200", Height - Seated (Max)="0.016\" (0.40mm)", Manufacturer Part Number 1=ERJ-2RKF1001X, Packaging=Digi-Reel®, Part Status=Active, Pricing 1="1=0.1, 10=0.056, 100=0.0227, 1000=0.01021, 2500=0.00886, 5000=0.00732 (USD)", RoHS="RoHS Compliant", Size / Dimension="0.039\" L x 0.020\" W (1.00mm x 0.50mm)", Stock 1=18630560, Supplier 1=Digi-Key
  R13 R14: .Checked PCB=used, .Checked SCH=used
  R45 R46 R56 R57 R58: .Checked SCH=CHK
R15: library part CRGCQ0402J470R, "RES 470 OHM 1/16W 5% 0402 SMD", Supplier Part Number=A130046CT-ND, .Checked SCH=CHK, Manufacturer Part Number=CRGCQ0402J470R
R16 R17 R19 R20: library part RC1005F222CS, "RES SMD 2.2K OHM 1% 1/16W 0402", Manufacturer 1="Samsung Electro-Mechanics", Operating Temperature="-55°C ~ 155°C", Package / Case="0402 (1005 Metric)", Power (Watts)="0.063W, 1/16W", Supplier Device Package=0402, Supplier Part Number 1=1276-4046-6-ND, Temperature Coefficient=±100ppm/°C, Tolerance=±1%, Category=Resistors, ComponentLink1Description=http://www.samsungsem.com/kr/support/product-search/chip-resistor/RC1005F222CS.jsp, ComponentLink1URL=http://www.samsungsem.com/kr/support/product-search/chip-resistor/RC1005F222CS.jsp, Composition="Thick Film", Description 1="RES SMD 2.2K OHM 1% 1/16W 0402", Failure Rate=-, Features="Moisture Resistant", Height - Seated (Max)="0.016\" (0.40mm)", Manufacturer Part Number 1=RC1005F222CS, Packaging=Digi-Reel®, Part Status=Active, Pricing 1="1=0.1, 10=0.021, 100=0.0087, 1000=0.00391, 2500=0.00339, 5000=0.0028 (USD)", RoHS="RoHS Compliant", Size / Dimension="0.039\" L x 0.020\" W (1.00mm x 0.50mm)", Stock 1=956467, Supplier 1=Digi-Key
  R19 R20: .Checked SCH=CHK
R21 R24: library part RC2012F104CS, "RES SMD 100K OHM 1% 1/8W 0805", Manufacturer 1="Samsung Electro-Mechanics", Operating Temperature="-55°C ~ 155°C", Package / Case="0805 (2012 Metric)", Power (Watts)="0.125W, 1/8W", Supplier Device Package=0805, Supplier Part Number 1=1276-3512-6-ND, Temperature Coefficient=±100ppm/°C, Tolerance=±1%, .Checked SCH=CHK, Category=Resistors, ComponentLink1Description=http://www.samsungsem.com/kr/support/product-search/chip-resistor/RC2012F104CS.jsp, ComponentLink1URL=http://www.samsungsem.com/kr/support/product-search/chip-resistor/RC2012F104CS.jsp, Composition="Thick Film", Description 1="RES SMD 100K OHM 1% 1/8W 0805", Failure Rate=-, Features="Moisture Resistant", Height - Seated (Max)="0.026\" (0.65mm)", Manufacturer Part Number 1=RC2012F104CS, Packaging=Digi-Reel®, Part Status=Active, Pricing 1="1=0.1, 10=0.059, 100=0.024, 1000=0.01079, 2500=0.00936 (USD)", RoHS="RoHS Compliant", Size / Dimension="0.079\" L x 0.049\" W (2.00mm x 1.25mm)", Stock 1=106479, Supplier 1=Digi-Key
R22 R23: library part CRG0805F4K7, "RES SMD 4.7K OHM 1% 1/8W 0805", Manufacturer 1="TE Connectivity Passive Product", Operating Temperature="-55°C ~ 125°C", Package / Case="0805 (2012 Metric)", Power (Watts)="0.125W, 1/8W", Supplier Device Package=0805, Supplier Part Number 1=A106065CT-ND, Temperature Coefficient=±100ppm/°C, Tolerance=±1%, .Checked SCH=CHK, Built_By=EMA_UL_Team, C="Copyright (C) 2015 Accelerated Designs. All rights reserved", Category=Resistors, ComponentLink1Description=http://www.te.com/commerce/DocumentDelivery/DDEController?Action=srchrtrv&DocNm=1773204&DocType=DS&DocLang=English, ComponentLink1URL=http://www.te.com/commerce/DocumentDelivery/DDEController?Action=srchrtrv&DocNm=1773204&DocType=DS&DocLang=English, Composition="Thick Film", Description 1="RES SMD 4.7K OHM 1% 1/8W 0805", Failure Rate=-, Features=-, Height - Seated (Max)="0.026\" (0.65mm)", Manufacturer_Part_Number=CRG0805F4K7, Manufacturer Part Number 1=CRG0805F4K7, Packaging="Cut Tape (CT)", Part Status=Active, Pricing 1="1=0.1, 10=0.035, 100=0.0143, 1000=0.00641, 2500=0.00557 (USD)", RefDes=RefDes, RoHS="RoHS Compliant", Size / Dimension="0.079\" L x 0.049\" W (2.00mm x 1.25mm)", Stock 1=28633, Supplier 1=Digi-Key, Type=DEV, Vendor="TE Connectivity"
R26 R27: library part RC0402FR-071RL, "RES 1.00 OHM 1/16W 1% 0402 SM", Manufacturer=Yageo, Package / Case="0402 (1005 Metric)", Power (Watts)="0.063W, 1/16W", Resistance (Ohms)=1, Supplier Part Number=311-1.00LRCT-ND, Temperature Coefficient=±200ppm/°C, Tolerance=±1%, Category=Resistors, ComponentLink1Description=http://www.yageo.com/documents/recent/PYu-RC0402_51_RoHS_L_6.pdf, ComponentLink1URL=http://www.yageo.com/documents/recent/PYu-RC0402_51_RoHS_L_6.pdf, Composition="Thick Film", Features=-, Height="0.016\" (0.40mm)", Manufacturer Part Number=RC0402FR-071RL, Number of Terminations=2, Packaging="Cut Tape (CT)", Price 1k [$]=0.01421, Pricing 1="10=0.019, 50=0.0142, 100=0.0109, 250=0.00808, 500=0.00596, 1000=0.00397 (USD)", RoHS="RoHS Compliant", Size / Dimension="0.039\" L x 0.020\" W (1.00mm x 0.50mm)", Stock 1=347765, Supplier=Digikey, Supplier 1=Digi-Key, Supplier Part Number 1=311-1.00LRCT-ND
R30 R31 R32: library part RC1005F204CS, "RES SMD 200K OHM 1% 1/16W 0402", Manufacturer 1="Samsung Electro-Mechanics", Operating Temperature="-55°C ~ 155°C", Package / Case="0402 (1005 Metric)", Power (Watts)="0.063W, 1/16W", Supplier Device Package=0402, Supplier Part Number 1=1276-3449-6-ND, Temperature Coefficient=±100ppm/°C, Tolerance=±1%, Category=Resistors, ComponentLink1Description=http://www.samsungsem.com/kr/support/product-search/chip-resistor/RC1005F204CS.jsp, ComponentLink1URL=http://www.samsungsem.com/kr/support/product-search/chip-resistor/RC1005F204CS.jsp, Composition="Thick Film", Description 1="RES SMD 200K OHM 1% 1/16W 0402", Failure Rate=-, Features="Moisture Resistant", Height - Seated (Max)="0.016\" (0.40mm)", Manufacturer Part Number 1=RC1005F204CS, Packaging=Digi-Reel®, Part Status=Active, Pricing 1="1=0.1, 10=0.021, 100=0.0087, 1000=0.00391, 2500=0.00339, 5000=0.0028 (USD)", RoHS="RoHS Compliant", Size / Dimension="0.039\" L x 0.020\" W (1.00mm x 0.50mm)", Stock 1=325433, Supplier 1=Digi-Key
R38: library part RC1005F103CS, "RES SMD 10K OHM 1% 1/16W 0402", Manufacturer 1="Samsung Electro-Mechanics", Operating Temperature="-55°C ~ 155°C", Package / Case="0402 (1005 Metric)", Power (Watts)="0.063W, 1/16W", Supplier Device Package=0402, Supplier Part Number 1=1276-3431-6-ND, Temperature Coefficient=±100ppm/°C, Tolerance=±1%, Category=Resistors, ComponentLink1Description=http://www.samsungsem.com/kr/support/product-search/chip-resistor/RC1005F103CS.jsp, ComponentLink1URL=http://www.samsungsem.com/kr/support/product-search/chip-resistor/RC1005F103CS.jsp, Composition="Thick Film", Description 1="RES SMD 10K OHM 1% 1/16W 0402", Failure Rate=-, Features="Moisture Resistant", Height - Seated (Max)="0.016\" (0.40mm)", Manufacturer Part Number 1=RC1005F103CS, Packaging=Digi-Reel®, Part Status=Active, Pricing 1="1=0.1, 10=0.021, 100=0.0087, 1000=0.00391, 2500=0.00339, 5000=0.0028 (USD)", RoHS="RoHS Compliant", Size / Dimension="0.039\" L x 0.020\" W (1.00mm x 0.50mm)", Stock 1=12738811, Supplier 1=Digi-Key
R43 R63 R64 R74 R76: library part RC0402FR-0710RL, "RES 10.0 OHM 1/16W 1% 0402 SMD", Manufacturer=Yageo, Package / Case="0402 (1005 Metric)", Power (Watts)="0.063W, 1/16W", Resistance (Ohms)=10, Supplier Part Number=311-10.0LRCT-ND, Temperature Coefficient=±200ppm/°C, Tolerance=±1%, .Checked SCH=CHK, Category=Resistors, ComponentLink1Description=http://www.yageo.com/documents/recent/PYu-RC0402_51_RoHS_L_6.pdf, ComponentLink1URL=http://www.yageo.com/documents/recent/PYu-RC0402_51_RoHS_L_6.pdf, Composition="Thick Film", Features=-, Height="0.016\" (0.40mm)", Manufacturer Part Number=RC0402FR-0710RL, Number of Terminations=2, Packaging="Cut Tape (CT)", Price 1k [$]=0.01421, Pricing 1="10=0.014, 50=0.0104, 100=0.0079, 250=0.00584, 500=0.00432, 1000=0.00288 (USD)", RoHS="RoHS Compliant", Size / Dimension="0.039\" L x 0.020\" W (1.00mm x 0.50mm)", Stock 1=681416, Supplier=Digikey, Supplier 1=Digi-Key, Supplier Part Number 1=311-10.0LRCT-ND
R44 R60: library part LTR18EZPF1200, "RES SMD 120 OHM 3/4W 1206 WIDE", Manufacturer 1=Rohm, Operating Temperature="-55°C ~ 155°C", Package / Case="Wide 1206 (3216 Metric), 0612", Power (Watts)="0.75W, 3/4W", Resistance (Ohms)=120, Standard Package=5,000, Supplier Device Package="1206 (3216 Metric)", Supplier Part Number 1=LTR18EZPF1200-REEL, Temperature Coefficient=±100ppm/°C, Tolerance=±1%, .Checked SCH=CHK, Category=Resistors, ComponentLink1Description=http://www.rohm.com/web/global/datasheet/LTR100JZPD/ltr-e?src-supplier=Digi-Key, ComponentLink1URL=http://www.rohm.com/web/global/datasheet/LTR100JZPD/ltr-e?src-supplier=Digi-Key, Composition="Thick Film", Description 1="RES SMD 120 OHM 3/4W 1206 WIDE", EDA / CAD Models="Download from Accelerated Designs", Family="Chip Resistor - Surface Mount", Featured Product="LTR Series Resistor", Features="Automotive AEC-Q200, Pulse Withstanding", Height="0.026\" (0.65mm)", Manufacturer Part Number 1=LTR18EZPF1200, Number of Terminations=2, Online Catalog="LTR18 Series", Other Names=RHM120YTR, Packaging="Tape & Reel (TR)", Pricing 1="5000=0.0202, 10000=0.0178, 15000=0.0177, 25000=0.0176 (USD)", Series=LTR, Size / Dimension="0.063\" L x 0.126\" W (1.60mm x 3.20mm)", Stock 1=5000, Supplier 1="Future Electronics"
R48: library part RMCF0402FT4K99, "RES TF 4.99K OHM 1% 1/16W 0402", Manufacturer="Stackpole Electronics Inc", Package / Case="0402 (1005 Metric)", Power (Watts)="0.063W, 1/16W", Resistance (Ohms)=4.99K, Supplier Part Number=RMCF0402FT4K99CT-ND, Temperature Coefficient=±100ppm/°C, Tolerance=±1%, .Checked SCH=CHK, Category=Resistors, ComponentLink1Description=http://www.seielect.com/Catalog/SEI-RMCF.pdf, ComponentLink1URL=http://www.seielect.com/Catalog/SEI-RMCF.pdf, Composition="Thick Film", Features=-, Height="0.016\" (0.40mm)", Manufacturer Part Number=RMCF0402FT4K99, Number of Terminations=2, Packaging="Cut Tape (CT)", Price 1k [$]=0.00384, Pricing 1="1=0.04, 10=0.025, 50=0.0138, 100=0.0105, 250=0.0078, 500=0.00576, 1000=0.00384 (USD)", RoHS="RoHS Compliant", Size / Dimension="0.039\" L x 0.020\" W (1.00mm x 0.50mm)", Stock 1=48509, Supplier=Digikey, Supplier 1=Digi-Key, Supplier Part Number 1=RMCF0402FT4K99CT-ND
R52 R54: library part RC1005F101CS, "RES SMD 100 OHM 1% 1/16W 0402", Manufacturer 1="Samsung Electro-Mechanics", Operating Temperature="-55°C ~ 155°C", Package / Case="0402 (1005 Metric)", Power (Watts)="0.063W, 1/16W", Supplier Device Package=0402, Supplier Part Number 1=1276-3429-6-ND, Temperature Coefficient=±100ppm/°C, Tolerance=±1%, .Checked SCH=CHK, Category=Resistors, ComponentLink1Description=http://www.samsungsem.com/kr/support/product-search/chip-resistor/RC1005F101CS.jsp, ComponentLink1URL=http://www.samsungsem.com/kr/support/product-search/chip-resistor/RC1005F101CS.jsp, Composition="Thick Film", Description 1="RES SMD 100 OHM 1% 1/16W 0402", Failure Rate=-, Features="Moisture Resistant", Height - Seated (Max)="0.016\" (0.40mm)", Manufacturer Part Number 1=RC1005F101CS, Packaging=Digi-Reel®, Part Status=Active, Pricing 1="1=0.1, 10=0.021, 100=0.0087, 1000=0.00391, 2500=0.00339, 5000=0.0028 (USD)", RoHS="RoHS Compliant", Size / Dimension="0.039\" L x 0.020\" W (1.00mm x 0.50mm)", Stock 1=461434, Supplier 1=Digi-Key
R55: library part RMCF0402FT365R, "RES TF 365 OHM 1% 1/16W 0402", Manufacturer="Stackpole Electronics Inc", Package / Case="0402 (1005 Metric)", Power (Watts)="0.063W, 1/16W", Resistance (Ohms)=365, Supplier Part Number=RMCF0402FT365RCT-ND, Temperature Coefficient=±100ppm/°C, Tolerance=±1%, .Checked SCH=CHK, Category=Resistors, ComponentLink1Description=http://www.seielect.com/Catalog/SEI-RMCF.pdf, ComponentLink1URL=http://www.seielect.com/Catalog/SEI-RMCF.pdf, Composition="Thick Film", Features=-, Height="0.016\" (0.40mm)", Manufacturer Part Number=RMCF0402FT365R, Number of Terminations=2, Packaging="Cut Tape (CT)", Price 1k [$]=0.00384, Pricing 1="1=0.04, 10=0.025, 50=0.0138, 100=0.0105, 250=0.0078, 500=0.00576, 1000=0.00384 (USD)", RoHS="RoHS Compliant", Size / Dimension="0.039\" L x 0.020\" W (1.00mm x 0.50mm)", Stock 1=28385, Supplier=Digikey, Supplier 1=Digi-Key, Supplier Part Number 1=RMCF0402FT365RCT-ND
S1: "SWITCH TACTILE SPST-NO 50MA 12V", Contact Rating @ Voltage="0.05A @ 12VDC", Illumination Type, Color=-, Manufacturer 1=E-Switch, Operating Force=160gf, Operating Temperature="-20°C ~ 70°C", Supplier Part Number 1=EG5350CT-ND, Actuator Height off PCB, Vertical=3.80mm, Actuator Length, Right Angle=-, Actuator Material=-, Actuator Orientation="Top Actuated", Actuator Type=Standard, Category=Switches, Circuit=SPST-NO, ComponentLink1Description=http://spec_sheets.e-switch.com/specs/P010468.pdf, ComponentLink1URL=http://spec_sheets.e-switch.com/specs/P010468.pdf, Description 1="SWITCH TACTILE SPST-NO 50MA 12V", Features=-, Illumination=Non-Illuminated, Illumination Voltage (Nominal)=-, Ingress Protection=-, Manufacturer Part Number 1=TL3305AF160QG, Mechanical Life="500,000 Cycles", Mounting Type="Surface Mount", Outline="4.50mm x 4.50mm", Packaging="Cut Tape (CT)", Part Status=Active, Pricing 1="1=0.22, 10=0.217, 25=0.2096, 50=0.202, 100=0.1907, 250=0.17952, 500=0.17204, 1000=0.1309 (USD)", RoHS="RoHS Compliant", Stock 1=46397, Supplier 1=Digi-Key, Switch Function=Off-Mom, Switch Travel=0.20mm, Termination Style="Gull Wing"
S2: "SWITCH TACTILE SPST-NO 0.05A 12V", Contact Rating @ Voltage="0.05A @ 12VDC", Illumination Type, Color=-, Manufacturer="TE Connectivity", Operating Force=160gf, Operating Temperature="-35°C ~ 85°C", Supplier Part Number 1=450-1657-ND, .Creator=MM, Actuator Height off PCB, from Pins=5.85mm, Actuator Material="Polyamide (PA), Nylon", Actuator Orientation="Side Actuated", Actuator Type=Standard, Category=Switches, Circuit=SPST-NO, ComponentLink1Description=http://www.te.com/commerce/DocumentDelivery/DDEController?Action=srchrtrv&DocNm=1825027&DocType=Customer+Drawing&DocLang=English, ComponentLink1URL=http://www.te.com/commerce/DocumentDelivery/DDEController?Action=srchrtrv&DocNm=1825027&DocType=Customer+Drawing&DocLang=English, Features=-, Illumination=Non-Illuminated, Illumination Voltage (Nominal)=-, Ingress Protection=-, Manufacturer Part Number=FSMRA3JH, Mechanical Life="100,000 Cycles", Mounting Type="Through Hole, Right Angle", Outline="7.10mm x 7.00mm", Packaging=Bulk, Pricing 1="1=0.15, 10=0.143, 25=0.1376, 50=0.1328, 100=0.1255, 250=0.11808, 500=0.11316, 1000=0.0861 (USD)", RoHS="RoHS Compliant", Stock 1=37985, Supplier 1=Digi-Key, Switch Function=Off-Mom, Switch Travel=0.25mm, Termination Style="PC Pin"
S3: "SWITCH TACTILE SPST-NO 0.05A 24V", Contact Rating @ Voltage="0.05A @ 24VDC", Illumination Type, Color=-, Manufacturer 1="TE Connectivity ALCOSWITCH Switches", Manufacturer Part Number 1=1825027-5, Operating Force=160gf, Operating Temperature="-35°C ~ 85°C", Supplier Part Number 1=450-1662-ND, Actuator Height off PCB, Vertical=-, Actuator Length, Right Angle=3.86mm, Actuator Material="Polybutylene Terephthalate (PBT)", Actuator Orientation="Side Actuated", Actuator Type=Standard, Category=Switches, Circuit=SPST-NO, ComponentLink1Description=http://www.te.com/commerce/DocumentDelivery/DDEController?Action=srchrtrv&DocNm=1825027&DocType=Customer+Drawing&DocLang=English, ComponentLink1URL=http://www.te.com/commerce/DocumentDelivery/DDEController?Action=srchrtrv&DocNm=1825027&DocType=Customer+Drawing&DocLang=English, Description 1="SWITCH TACTILE SPST-NO 0.05A 24V", Features=-, Illumination=Non-Illuminated, Illumination Voltage (Nominal)=-, Ingress Protection=-, Mechanical Life="100,000 Cycles", Mounting Type="Through Hole, Right Angle", Outline="7.10mm x 7.00mm", Packaging=Bulk, Part Status=Active, Pricing 1="1=0.17, 10=0.169, 25=0.1628, 50=0.157, 100=0.1482, 250=0.13952, 500=0.1337, 1000=0.10173, 5000=0.08429 (USD)", RoHS="RoHS Compliant", Stock 1=37455, Supplier 1=Digi-Key, Switch Function=Off-Mom, Switch Travel=0.25mm, Termination Style="PC Pin"
S4: "SWITCH ROCKER SPST 15A 125V", Color - Actuator/Cap=Black, Current Rating="15A (AC)", Illumination Type, Color=-, Manufacturer 1=E-Switch, Operating Temperature="-30°C ~ 65°C", Supplier Part Number 1=EG2578-ND, Actuator Marking="O I", Actuator Type="Concave (Curved)", Category=Switches, Circuit=SPST, ComponentLink1Description=http://spec_sheets.e-switch.com/specs/M301223.pdf, ComponentLink1URL=http://spec_sheets.e-switch.com/specs/M301223.pdf, Description 1="SWITCH ROCKER SPST 15A 125V", Electrical Life="10,000 Cycles", Features=-, Illumination Voltage (Nominal)=-, Ingress Protection=-, LatestRevisionDate=17-Jul-2002, LatestRevisionNote="Re-released for DXP Platform.", Manufacturer Part Number 1=R1966ABLKBLKGR, Mechanical Life="30,000 Cycles", Mounting Type="Panel Mount, Snap-In, Right Angle", PackageDescription="Switch; 2 Leads", PackageReference=SPST-2, Packaging=Bulk, Panel Cutout Dimensions="Rectangular - 19.40mm x 13.00mm", Part Status=Active, Pricing 1="1=1.58, 10=1.507, 25=1.4384, 50=1.37, 100=1.3015, 250=1.26724, 500=1.19876, 1000=1.06175, 5000=1.0275 (USD)", Published=24-Mar-1999, Publisher="Altium Limited", RoHS="RoHS Compliant", Stock 1=9, Supplier 1=Digi-Key, Switch Function=On-Off, Termination Style="PC Pin"
T1: "MODULE SINGLE GIGABIT LAN 24SOIC", Inductance=-, Manufacturer="PULSE ELECTRONICS CORPORATION", Operating Temperature="0°C ~ 70°C", Supplier Part Number=553-1334-ND, .Checked PCB=USED, .Checked SCH=USED, Category=Transformers, ComponentLink1Description=http://ww2.pulseeng.com/products/datasheets/HC500.pdf, ComponentLink1URL=http://ww2.pulseeng.com/products/datasheets/HC500.pdf, E.T.=-, Family=Pulse, Height - Seated (Max)=5.76mm, Manufacturer Part Number=H5007NL, Mounting Type="Surface Mount", Price 1k [$]=3.25125, Pricing 1="1=5.74, 10=5.1, 100=4.08, 250=3.69752, 500=3.50626, 1000=3.25125, 5000=3.162 (USD)", RoHS="RoHS Compliant", Size / Dimension="17.53mm L x 12.20mm W", Stock 1=15654, Supplier=Digikey, Supplier 1=Digi-Key, Supplier Part Number 1=553-1334-ND, Transformer Type="Isolation and Data Interface (Encapsulated)", Turns Ratio - Primary:Secondary="1CT : 1CT"
TP1 TP2 TP3 TP4: "Test Point 25mil"